# Altium PCB WireCuttingSampling.PcbDoc (part 1 of 2)
Units mil, origin at the board's own origin, x right, y up, seen from the top; angles counter-clockwise.
Board outline 4901 x 3424.05 mil, 2 copper layers (Top Layer, Bottom Layer); 137 components, 97 nets, 362 pads, 199 vias.
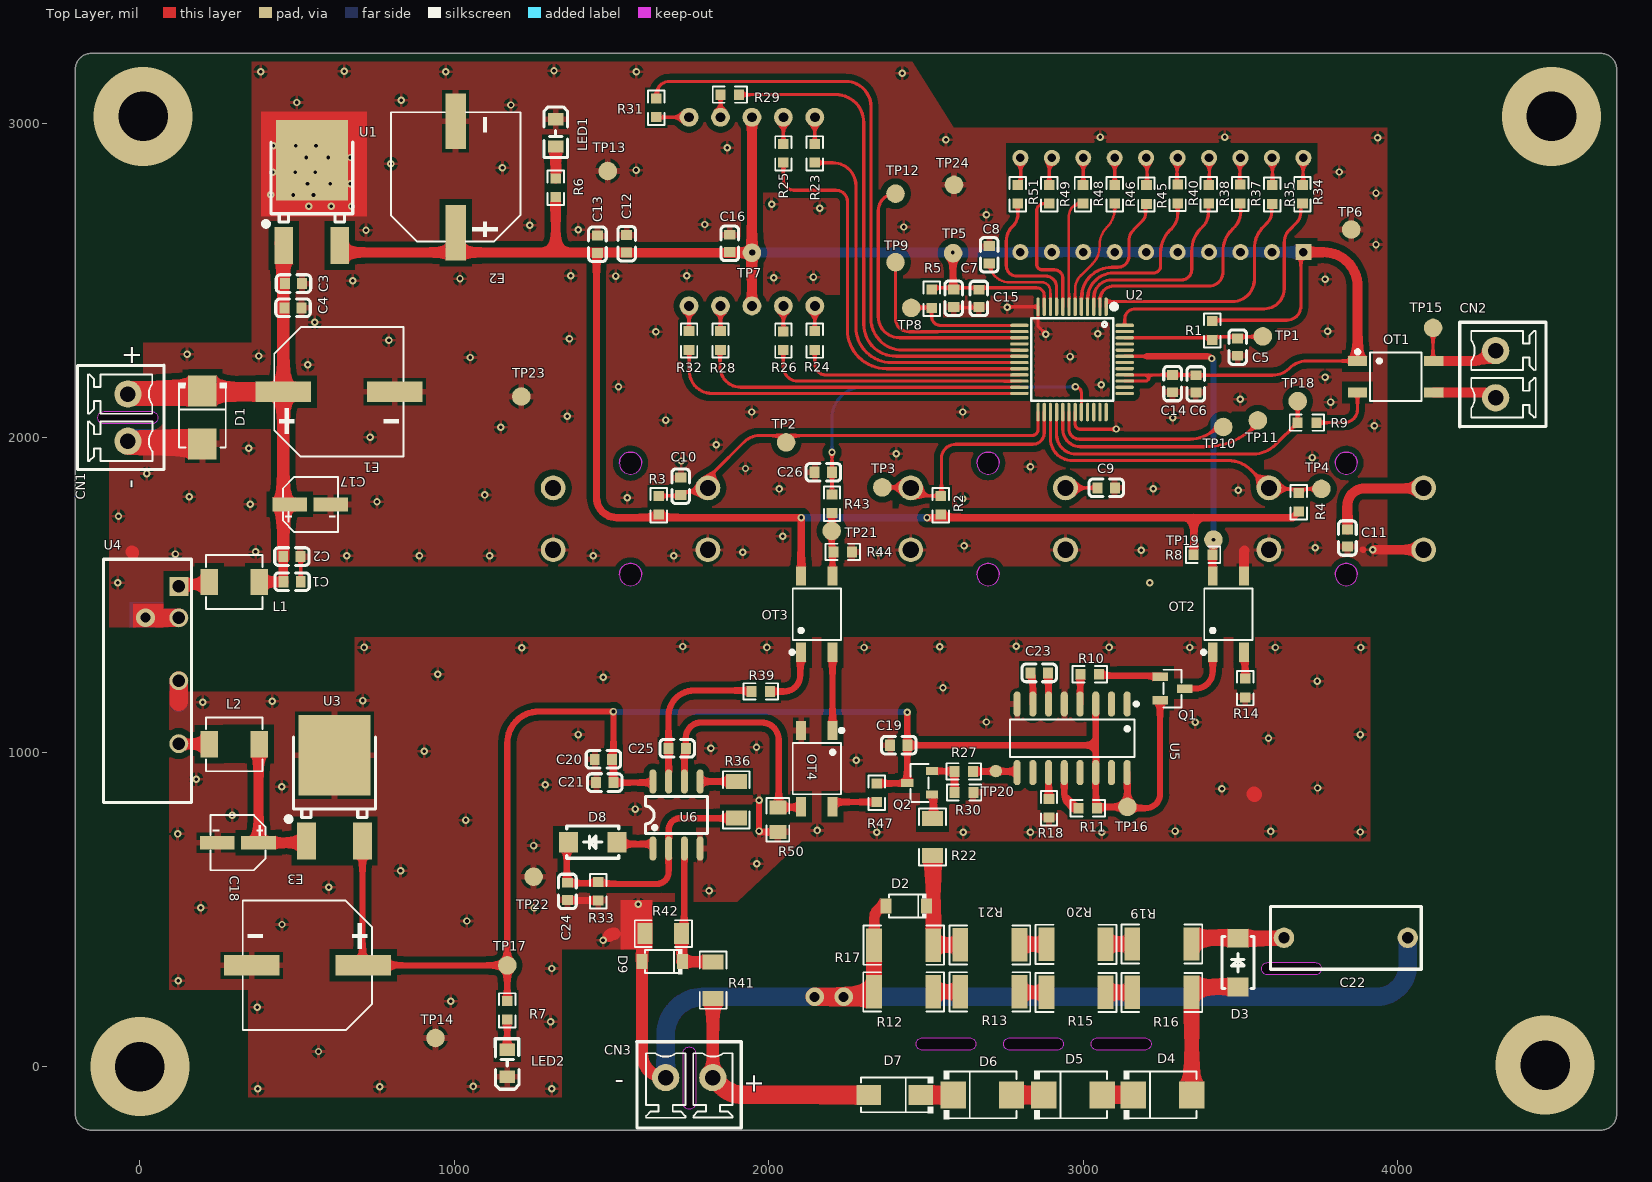
[diagram p0: Top Layer view]
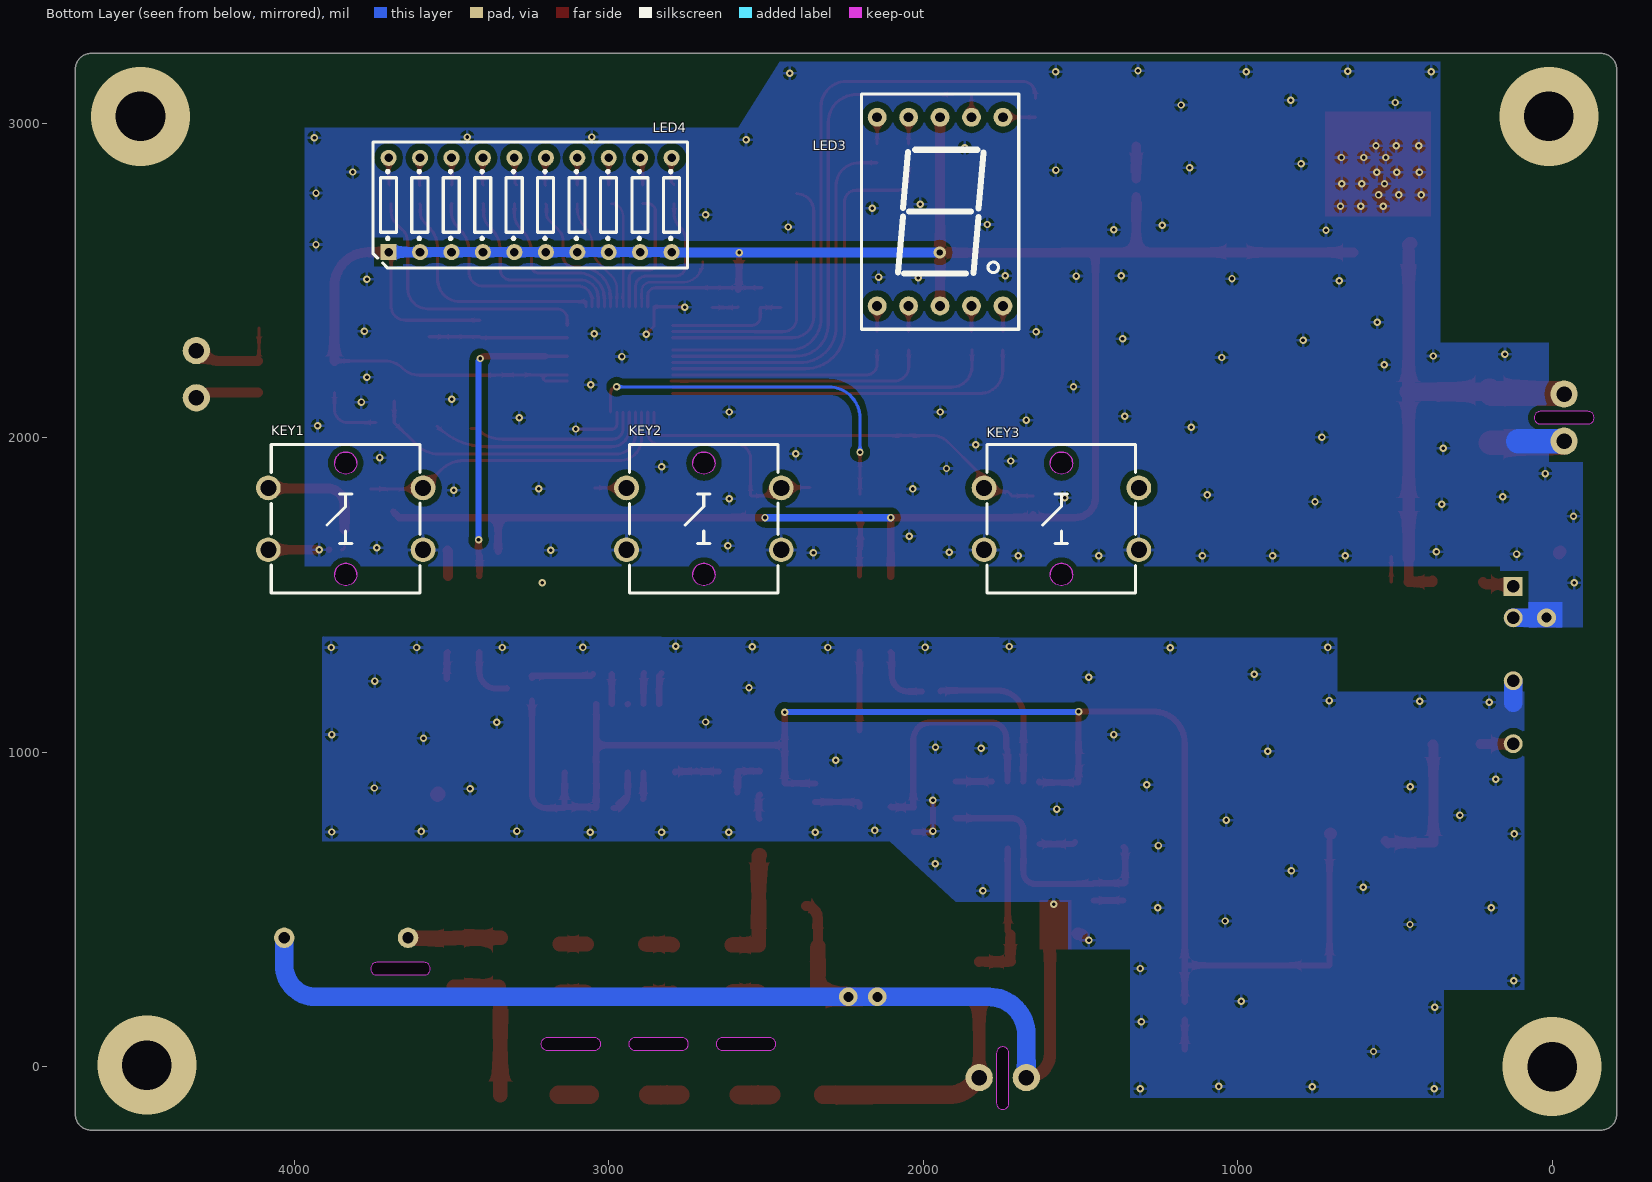
[diagram p1: Bottom Layer view, seen from below]

## Layer stack, top to bottom
Top Solder: solder mask 0.4, Solder Resist, Dk 3.5
Top Layer: signal copper 1.4
Dielectric 1: dielectric 12.6, FR-4, Dk 4.8
Bottom Layer: signal copper 1.4
Bottom Solder: solder mask 0.4, Solder Resist, Dk 3.5

## Board outline
-155,-202 cw(c-155,-152) -205,-152 -204.96,3172.05 -204.9,3172.05 cw(c-154.9,3172.05) -154.9,3222.05 4646,3222.05 cw(c4646,3172.05) 4696,3172.05 4696,-152 cw(c4646,-152) 4646,-202 4645.15,-202
cut-out: -114,2043.97 cw(c-114,2063.65) -114,2083.34 37,2083.34 cw(c37,2063.65) 37,2043.97
cut-out: 1727.64,-116 1727.62,43 cw(c1747.31,43) 1766.99,43 1767,43 1767,-116 1767.01,-116 cw(c1747.32,-116)
cut-out: 3586.68,291.76 cw(c3586.68,311.44) 3586.68,331.13 3737.68,331.13 cw(c3737.68,311.44) 3737.68,291.76
cut-out: 3045,52.26 cw(c3045,71.95) 3045,91.63 3196,91.63 cw(c3196,71.95) 3196,52.26
cut-out: 2766,52.26 cw(c2766,71.95) 2766,91.63 2917,91.63 cw(c2917,71.95) 2917,52.26
cut-out: 2488,52.26 cw(c2488,71.95) 2488,91.63 2639,91.63 cw(c2639,71.95) 2639,52.26

## Design rules (kind name [scope] priority, off if disabled: settings)
Clearance Clearance_1 [InPolygon] p1: gap=19.68 ignorepadtopadclearanceinfootprint=FALSE
Clearance [All] p2: gap=7.87 ignorepadtopadclearanceinfootprint=FALSE
PlaneConnect [All] p1: planeconnectstyle=Relief reliefexpansion=20 reliefentries=4 reliefconductorwidth=19.68 reliefairgap=19.68
PolygonConnect [All] p1: thpad.connectstyle=Relief thpad.reliefconductorwidth=10 thpad.reliefentries=4 thpad.polygonreliefangle="90 Angle" thpad.airgapwidth=10 smdpad.connectstyle=Relief smdpad.reliefconductorwidth=19.68 smdpad.reliefentries=4 smdpad.polygonreliefangle="90 Angle" smdpad.airgapwidth=10 via.connectstyle=Relief via.reliefconductorwidth=10 via.reliefentries=4 via.polygonreliefangle="90 Angle" via.airgapwidth=10
RoutingVias [All] p1: holewidth=28 width=50 viastyle="Through Hole" minholewidth=28 minwidth=50 maxholewidth=28 maxwidth=50
SolderMaskExpansion [All] p1: expansion=4 istentingtop=FALSE
Width 5V [All] p1: maxlimit=78.74 minlimit=7.87 preferedwidth=39.37 minimp=50.000000 maximp=50.000000 favimp=50.000000
Width 12V [InNet('+12V')] p2: maxlimit=78.74 minlimit=7.87 preferedwidth=59.06 minimp=50.000000 maximp=50.000000 favimp=50.000000
Width [All] p3: maxlimit=78.74 minlimit=7.87 preferedwidth=10 minimp=50.000000 maximp=50.000000 favimp=50.000000
29 further rules are at their usual default settings.

## Components (designator, comment, footprint, x,y, rotation, side; value= is the part's Value field where it differs from the comment)
C1 "10nF ±10%" C0603 484,1542 r180 top value=10nF
C2 "100nF ±10%" C0603 483.5,1622 r180 top value=100nF
C3 "10nF ±10%" C0603 488.5,2489.95 r180 top value=10nF
C4 "100nF ±10%" C0603 487,2412.95 r180 top value=100nF
C5 "10uF ±20%" C0603 3491,2288 r90 top value=10uF
C6 "100nF ±10%" C0603 3358,2171 r90 top value=100nF
C7 "100nF ±10%" C0603 2588,2443.5 r270 top value=100nF
C8 "1uF ±10%" C0603 2701,2581.6 r270 top value=1uF
C9 "100nF ±10%" C0603 3073.11,1840.4 r180 top value=100nF
C10 "100nF ±10%" C0603 1720,1845.6 r270 top value=100nF
C11 "100nF ±10%" C0603 3840,1681 r90 top value=100nF
C12 "100nF ±10%" C0603 1548,2617 r270 top value=100nF
C13 "100nF ±10%" C0603 1455,2615 r270 top value=100nF
C14 "10nF ±10%" C0603 3284,2172 r90 top value=10nF
C15 "10nF ±10%" C0603 2668,2443 r90 top value=10nF
C16 "100nF ±10%" C0603 1876,2618 r270 top value=100nF
C17 "vt50v4r7m4x5" CAP-SMD_BD4.0-L4.3-W4.3-LS5.0-FD 542,1787.63 r0 top value=4.7uF
C18 "vt50v4r7m4x5" CAP-SMD_BD4.0-L4.3-W4.3-LS5.0-FD 312,712 r180 top value=4.7uF
C19 "100nF ±10%" C0603 2413.5,1022 r180 top value=100nF
C20 "100nF ±10%" C0603 1474,977 r180 top value=100nF
C21 "10nF ±10%" C0603 1478.5,903.13 r180 top value=10nF
C22 "33nF ±10%" CAP-TH_L12.0-W5.0-P10.00-D0.6-1 3835,409.68 r0 top value=33nF
C23 "470nF ±10%" C0603 2860,1252 r0 top value=470nF
C24 "100nF ±10%" C0603 1359.67,557.23 r270 top value=100nF
C25 "100nF ±10%" C0603 1708.67,1012.13 r180 top value=100nF
C26 "100nF ±10%" C0603 2173.5,1890 r180 top value=100nF
CN1 "wj15edgvc-3.81-02p-14-00a" CONN-TH_WJ15EDGVC-3.81-2P -38,2063.79 r270 top
CN2 "wj15edgvc-3.81-02p-14-00a" CONN-TH_WJ15EDGVC-3.81-2P 4311.37,2202 r90 top
CN3 "wj15edgvc-3.81-02p-14-00a" CONN-TH_WJ15EDGVC-3.81-2P 1747,-35 r0 top
D1 "smbj15a_c19077569" SMB_L4.3-W3.6-LS5.3-RD 199,2064.26 r270 top
D2 "bzt52c5v1" SOD-123_L2.7-W1.6-LS3.7-RD 2437,511 r180 top
D3 "ss14_c2480" SMA_L4.2-W2.6-LS5.0-RD_1 3492,330.68 r270 top
D4 "smbj12a_c353398" SMB_L4.6-W3.6-LS5.3-RD 3252,-90 r0 top
D5 "smbj12a_c353398" SMB_L4.6-W3.6-LS5.3-RD 2967,-90 r0 top
D6 "smbj12a_c353398" SMB_L4.6-W3.6-LS5.3-RD 2679,-90 r0 top
D7 "1n4007" SMA_L4.3-W2.5-LS5.0-RD 2400.7,-90 r180 top
D8 "ss14_c2480" SMA_L4.2-W2.6-LS5.0-RD_1 1440,713.76 r0 top
D9 "bzt52c5v1" SOD-123_L2.7-W1.6-LS3.7-RD 1661,333.76 r180 top
E1 "1000uf 16v" CAP-SMD_BD10.0-L10.3-W10.3-FD 633.1,2145.95 r0 top value=1000uF
E2 "1000uf 16v" CAP-SMD_BD10.0-L10.3-W10.3-FD 1004,2829.1 r90 top value=1000uF
E3 "1000uf 16v" CAP-SMD_BD10.0-L10.3-W10.3-FD 533,322 r180 top value=1000uF
KEY1 "b3f-4055_c84931" KEY-TH_4P-L12.0-W12.0-P5.00-LS13.4-EH 3836.48,1742 r0 bottom locked
KEY2 "b3f-4055_c84931" KEY-TH_4P-L12.0-W12.0-P5.00-LS13.4-EH 2697.37,1742 r0 bottom locked
KEY3 "b3f-4055_c84931" KEY-TH_4P-L12.0-W12.0-P5.00-LS13.4-EH 1560.26,1742 r0 bottom locked
L1 "fxl0420-4r7-m" IND-SMD_L4.4-W4.2 300.2,1541 r0 top value=4.7uH
L2 "fxl0420-4r7-m" IND-SMD_L4.4-W4.2 300.2,1025 r180 top value=4.7uH
LED1 "xl-2012ubc" LED0805-RD 1322.37,2969.3 r270 top
LED2 "xl-2012ubc" LED0805-RD 1168,10.7 r90 top
LED3 "sm410561n" LED-SEG-TH_10P-L12.7-W19.0-P2.54-S15.24-BL 1946.37,2719 r180 bottom
LED4 "b1001sdrwb/s530-a3" LED-SEG-TH_20P-L25.3-W10.1-P2.54-S7.6-BL 3250,2740 r180 bottom
OT1 "ltv-356t-c" SOP-4_L3.9-W4.4-P2.54-LS7.0-TL 3993.57,2194 r0 top
OT2 "ltv-356t-c" SOP-4_L3.9-W4.4-P2.54-LS7.0-TL 3461.67,1438.76 r90 top
OT3 "ltv-356t-c" SOP-4_L3.9-W4.4-P2.54-LS7.0-TL 2153,1438.76 r90 top
OT4 "ltv-356t-c" SOP-4_L3.9-W4.4-P2.54-LS7.0-TL 2153,947.7 r270 top
Q1 "s9015_c20069131" SOT-23-3_L2.9-W1.3-P0.95-LS2.4-BR 3284,1202 r180 top
Q2 "2n7002kt1g" SOT-23-3_L2.9-W1.3-P1.90-LS2.4-BR 2479.67,902.13 r0 top
R1 "frc0603f1002ts" R0603 3410,2340.76 r90 top value=10kΩ
R2 "frc0603f1002ts" R0603 2547,1785.4 r270 top value=10kΩ
R3 "frc0603f1002ts" R0603 1650,1785.4 r270 top value=10kΩ
R4 "frc0603f1002ts" R0603 3685.37,1795 r270 top value=10kΩ
R5 "frc0603f1002ts" R0603 2518,2442.06 r90 top value=10kΩ
R6 "frc0603f1002ts" R0603 1322.37,2795 r270 top value=10kΩ
R7 "frc0603f1002ts" R0603 1168,179 r270 top value=10kΩ
R8 "frc0603f2201ts" R0603 3381,1627.76 r180 top value=2.2kΩ
R9 "510Ω ±1%" R0603 3711.37,2048 r180 top value=510Ω
R10 "5.1kΩ ±1%" R0603 3020.67,1248 r0 top value=5.1kΩ
R11 "1MΩ ±1%" R0603 3013.97,822 r0 top value=1MΩ
R12 "2kΩ ±1%" R2010 2428.9,238 r180 top value=2kΩ
R13 "2kΩ ±1%" R2010 2702.9,238 r180 top value=2kΩ
R14 "510Ω ±1%" R0603 3515,1203.76 r90 top value=510Ω
R15 "2kΩ ±1%" R2010 2976.9,236 r180 top value=2kΩ
R16 "2kΩ ±1%" R2010 3250,236 r180 top value=2kΩ
R17 "12kΩ ±1%" R2010 2429,386 r180 top value=12kΩ
R18 "1kΩ ±1%" R0603 2891,821.76 r90 top value=1kΩ
R19 "2kΩ ±1%" R2010 3250,390 r0 top value=2kΩ
R20 "2kΩ ±1%" R2010 2976.9,389 r0 top value=2kΩ
R21 "2kΩ ±1%" R2010 2702.9,387 r0 top value=2kΩ
R22 "4.7kΩ ±1%" R1206 2520.67,730.2 r90 top value=4.7kΩ
R23 "1kΩ ±1%" R0603 2146.37,2904.1 r270 top value=1kΩ
R24 "1kΩ ±1%" R0603 2146.37,2309 r270 top value=1kΩ
R25 "1kΩ ±1%" R0603 2046.37,2904.1 r270 top value=1kΩ
R26 "1kΩ ±1%" R0603 2046.37,2308.7 r270 top value=1kΩ
R27 "frc0603f2201ts" R0603 2620,938.76 r180 top value=2.2kΩ
R28 "1kΩ ±1%" R0603 1846.37,2309 r90 top value=1kΩ
R29 "1kΩ ±1%" R0603 1876.37,3091 r180 top value=1kΩ
R30 "1.5kΩ ±1%" R0603 2621,871.76 r180 top value=1.5kΩ
R31 "1kΩ ±1%" R0603 1642.37,3049 r270 top value=1kΩ
R32 "1kΩ ±1%" R0603 1746.37,2309 r90 top value=1kΩ
R33 "1MΩ ±1%" R0603 1458,558 r270 top value=1MΩ
R34 "1kΩ ±1%" R0603 3697,2774 r270 top value=1kΩ
R35 "1kΩ ±1%" R0603 3601,2773.4 r270 top value=1kΩ
R36 "4.7kΩ ±1%" R1206 1896.67,848.33 r90 top value=4.7kΩ
R37 "1kΩ ±1%" R0603 3499,2775 r270 top value=1kΩ
R38 "1kΩ ±1%" R0603 3399,2774 r270 top value=1kΩ
R39 "330Ω ±1%" R0603 1974.37,1193 r0 top value=330Ω
R40 "1kΩ ±1%" R0603 3300,2775 r270 top value=1kΩ
R41 "frc1206j104 ts" R1206 1823,275 r90 top value=100kΩ
R42 "frc1206j222 ts" R1206 1664.8,423 r0 top value=2.2kΩ
R43 "47kΩ ±1%" R0603 2201,1790 r90 top value=47kΩ
R44 "frc0603f2201ts" R0603 2235,1636.76 r0 top value=2.2kΩ
R45 "1kΩ ±1%" R0603 3201,2773.4 r270 top value=1kΩ
R46 "1kΩ ±1%" R0603 3100,2774 r270 top value=1kΩ
R47 "frc0603f2201ts" R0603 2343.37,871 r90 top value=2.2kΩ
R48 "1kΩ ±1%" R0603 2999,2774 r270 top value=1kΩ
R49 "1kΩ ±1%" R0603 2891.96,2774 r270 top value=1kΩ
R50 "frc0805f4601ts" R0805 2029,785.3 r90 top value=4.6kΩ
R51 "1kΩ ±1%" R0603 2791.96,2774.4 r270 top value=1kΩ
TP1 "TP" TP#1 3571,2322 r0 top
TP2 "TP" TP#1 2055,1985 r90 top
TP3 "TP" TP#1 2361,1842 r90 top
TP4 "TP" TP#1 3757.37,1837 r0 top
TP5 "TP" TP#1 2586,2586.76 r90 top
TP6 "TP" TP#1 3852,2662 r90 top
TP7 "TP" TP#1 1946.27,2588 r0 top
TP8 "TP" TP#1 2453,2412.76 r90 top
TP9 "TP" TP#1 2403,2558 r90 top
TP10 "TP" TP#1 3445,2034 r90 top
TP11 "TP" TP#1 3555,2055 r90 top
TP12 "TP" TP#1 2403,2776 r90 top
TP13 "TP" TP#1 1488,2848 r90 top
TP14 "TP" TP#1 940,91 r90 top
TP15 "TP" TP#1 4112.37,2349 r90 top
TP16 "TP" TP#1 3140.37,826 r90 top
TP17 "TP" TP#1 1168.37,322 r90 top
TP18 "TP" TP#1 3682,2116 r90 top
TP19 "TP" TP#1 3414,1675.76 r270 top
TP20 "TP" TP#2 2722,939.76 r0 top
TP21 "TP" TP#1 2200,1703.4 r90 top
TP22 "TP" TP#1 1252,603.76 r90 top
TP23 "TP" TP#1 1213,2131 r90 top
TP24 "TP" TP#1 2589,2804 r90 top
U1 "cj78m05" TO-252-3_L6.5-W5.8-P4.58-TL 547,2746.94 r90 top
U2 "m0518ld2ae" LQFP-48_L7.0-W7.0-P0.50-LS9.0-BL 2964.48,2249 r180 top
U3 "cj78m05" TO-252-3_L6.5-W5.8-P4.58-TL 619,854 r90 top
U4 "b1212s-2wr3_c2992389" PWRM-TH_4P-L19.7-W7.1-P2.54_DEXU_NN2-12S05CN 124,1277 r270 top value=100kHz
U5 "cd4046bm/tr" SOP-16_L9.9-W3.9-P1.27-LS6.0-BL 2964.67,1044.1 r180 top
U6 "lm358dr2g" SOIC-8_L5.0-W4.0-P1.27-LS6.0-BL 1706.67,800.13 r0 top

## Footprints (in the part's own frame and the unit in brackets; to place one, negate y for a bottom-side part, rotate by r counter-clockwise, add the part's x,y. Pads: shape width x height; smd on the part's side, far side on the other; paste and mask are expansions set on the pad)
C0603 [mil]
  rect 31.5x35.4 smd: 1(-27.5,0) 2(27.6,0)
  silkscreen extent -55,-28 55,28
CAP-SMD_BD4.0-L4.3-W4.3-LS5.0-FD [mil]
  rect 110.2x43.3 smd: 1(-65.4,0) 2(65.4,0)
  silkscreen extent -87,-88 88,88
CAP-SMD_BD10.0-L10.3-W10.3-FD [mil]
  rect 177.2x65 smd: 1(-177.1,0) 2(177.2,0)
  silkscreen extent -206,-206 206,206
CAP-TH_L12.0-W5.0-P10.00-D0.6-1 [mil]
  round 65 hole 35.4: 1(-196.8,0) 2(196.8,0)
  silkscreen extent -240,-100 240,100
CONN-TH_WJ15EDGVC-3.81-2P [mil]
  round 86.6 hole 49.2: 1(-75,0) 2(75,0)
  silkscreen extent -168,-160 165,114
IND-SMD_L4.4-W4.2 [mil]
  rect 55.1x83.5 smd: 1(79.8,0) 2(-79.8,0)
  silkscreen extent -90,-86 90,86
KEY-TH_4P-L12.0-W12.0-P5.00-LS13.4-EH [mil]
  round 78.7 hole 51.2: 1(246.1,-98.4) 2(-246,-98.4) 3(246.1,98.4) 4(-246,98.4)
  Keep-Out Layer board cut-out: 35.5,-177.2 35.1,-182.5 33.9,-187.6 32,-192.6 29.3,-197.1 26,-201.3 22.1,-204.9 17.7,-207.9 13,-210.2 7.9,-211.7 2.7,-212.5 -2.6,-212.5 -7.9,-211.7 -12.9,-210.2 -17.7,-207.9 -22.1,-204.9 -25.9,-201.3 -29.2,-197.1 -31.9,-192.6 -33.8,-187.6 -35,-182.5 -35.4,-177.2 -35,-171.9 -33.8,-166.7 -31.9,-161.8 -29.2,-157.2 -25.9,-153.1 -22.1,-149.5 -17.7,-146.5 -12.9,-144.2 -7.9,-142.6 -2.6,-141.9 2.7,-141.9 7.9,-142.6 13,-144.2 17.7,-146.5 22.1,-149.5 26,-153.1 29.3,-157.2 32,-161.8 33.9,-166.7 35.1,-171.9 35.5,-177.2
  Keep-Out Layer board cut-out: 35.5,177.1 35.1,171.9 33.9,166.7 32,161.8 29.3,157.2 26,153 22.1,149.4 17.7,146.5 13,144.2 7.9,142.6 2.7,141.8 -2.6,141.8 -7.9,142.6 -12.9,144.2 -17.7,146.5 -22.1,149.4 -25.9,153 -29.2,157.2 -31.9,161.8 -33.8,166.7 -35,171.9 -35.4,177.1 -35,182.4 -33.8,187.6 -31.9,192.5 -29.2,197.1 -25.9,201.2 -22.1,204.8 -17.7,207.8 -12.9,210.1 -7.9,211.7 -2.6,212.5 2.7,212.5 7.9,211.7 13,210.1 17.7,207.8 22.1,204.8 26,201.2 29.3,197.1 32,192.5 33.9,187.6 35.1,182.4 35.5,177.1
  Keep-Out Layer region: 35.5,-177.2 35.1,-182.5 33.9,-187.6 32,-192.6 29.3,-197.1 26,-201.3 22.1,-204.9 17.7,-207.9 13,-210.2 7.9,-211.7 2.7,-212.5 -2.6,-212.5 -7.9,-211.7 -12.9,-210.2 -17.7,-207.9 -22.1,-204.9 -25.9,-201.3 -29.2,-197.1 -31.9,-192.6 -33.8,-187.6 -35,-182.5 -35.4,-177.2 -35,-171.9 -33.8,-166.7 -31.9,-161.8 -29.2,-157.2 -25.9,-153.1 -22.1,-149.5 -17.7,-146.5 -12.9,-144.2 -7.9,-142.6 -2.6,-141.9 2.7,-141.9 7.9,-142.6 13,-144.2 17.7,-146.5 22.1,-149.5 26,-153.1 29.3,-157.2 32,-161.8 33.9,-166.7 35.1,-171.9 35.5,-177.2
  Keep-Out Layer region: 35.5,-177.2 35.1,-182.5 33.9,-187.6 32,-192.6 29.3,-197.1 26,-201.3 22.1,-204.9 17.7,-207.9 13,-210.2 7.9,-211.7 2.7,-212.5 -2.6,-212.5 -7.9,-211.7 -12.9,-210.2 -17.7,-207.9 -22.1,-204.9 -25.9,-201.3 -29.2,-197.1 -31.9,-192.6 -33.8,-187.6 -35,-182.5 -35.4,-177.2 -35,-171.9 -33.8,-166.7 -31.9,-161.8 -29.2,-157.2 -25.9,-153.1 -22.1,-149.5 -17.7,-146.5 -12.9,-144.2 -7.9,-142.6 -2.6,-141.9 2.7,-141.9 7.9,-142.6 13,-144.2 17.7,-146.5 22.1,-149.5 26,-153.1 29.3,-157.2 32,-161.8 33.9,-166.7 35.1,-171.9 35.5,-177.2
  Keep-Out Layer region: 35.5,177.1 35.1,171.9 33.9,166.7 32,161.8 29.3,157.2 26,153 22.1,149.4 17.7,146.5 13,144.2 7.9,142.6 2.7,141.8 -2.6,141.8 -7.9,142.6 -12.9,144.2 -17.7,146.5 -22.1,149.4 -25.9,153 -29.2,157.2 -31.9,161.8 -33.8,166.7 -35,171.9 -35.4,177.1 -35,182.4 -33.8,187.6 -31.9,192.5 -29.2,197.1 -25.9,201.2 -22.1,204.8 -17.7,207.8 -12.9,210.1 -7.9,211.7 -2.6,212.5 2.7,212.5 7.9,211.7 13,210.1 17.7,207.8 22.1,204.8 26,201.2 29.3,197.1 32,192.5 33.9,187.6 35.1,182.4 35.5,177.1
  Keep-Out Layer region: 35.5,177.1 35.1,171.9 33.9,166.7 32,161.8 29.3,157.2 26,153 22.1,149.4 17.7,146.5 13,144.2 7.9,142.6 2.7,141.8 -2.6,141.8 -7.9,142.6 -12.9,144.2 -17.7,146.5 -22.1,149.4 -25.9,153 -29.2,157.2 -31.9,161.8 -33.8,166.7 -35,171.9 -35.4,177.1 -35,182.4 -33.8,187.6 -31.9,192.5 -29.2,197.1 -25.9,201.2 -22.1,204.8 -17.7,207.8 -12.9,210.1 -7.9,211.7 -2.6,212.5 2.7,212.5 7.9,211.7 13,210.1 17.7,207.8 22.1,204.8 26,201.2 29.3,197.1 32,192.5 33.9,187.6 35.1,182.4 35.5,177.1
  Keep-Out Layer lines w0.1: -35.4,177.1 -35,182.4 -33.8,187.6 -31.9,192.5 -29.2,197.1 -25.9,201.2 -22.1,204.8 -17.7,207.8 -12.9,210.1 -7.9,211.7 -2.6,212.5 2.7,212.5 7.9,211.7 13,210.1 17.7,207.8 22.1,204.8 26,201.2 29.3,197.1 32,192.5 33.9,187.6 35.1,182.4 35.5,177.1 35.1,171.9 33.9,166.7 32,161.8 29.3,157.2 26,153 22.1,149.4 17.7,146.5 13,144.2 7.9,142.6 2.7,141.8 -2.6,141.8 -7.9,142.6 -12.9,144.2 -17.7,146.5 -22.1,149.4 -25.9,153 -29.2,157.2 -31.9,161.8 -33.8,166.7 -35,171.9 -35.4,177.1 ; -35.4,-177.2 -35,-171.9 -33.8,-166.7 -31.9,-161.8 -29.2,-157.2 -25.9,-153.1 -22.1,-149.5 -17.7,-146.5 -12.9,-144.2 -7.9,-142.6 -2.6,-141.9 2.7,-141.9 7.9,-142.6 13,-144.2 17.7,-146.5 22.1,-149.5 26,-153.1 29.3,-157.2 32,-161.8 33.9,-166.7 35.1,-171.9 35.5,-177.2 35.1,-182.5 33.9,-187.6 32,-192.6 29.3,-197.1 26,-201.3 22.1,-204.9 17.7,-207.9 13,-210.2 7.9,-211.7 2.7,-212.5 -2.6,-212.5 -7.9,-211.7 -12.9,-210.2 -17.7,-207.9 -22.1,-204.9 -25.9,-201.3 -29.2,-197.1 -31.9,-192.6 -33.8,-187.6 -35,-182.5 -35.4,-177.2
  silkscreen extent -236,-236 237,236
LED0805-RD [mil]
  rect 39.4x49.2 smd: 1(-43.3,0) 2(43.3,0)
  silkscreen extent -83,-37 78,38
LED-SEG-TH_10P-L12.7-W19.0-P2.54-S15.24-BL [mil]
  round 60 hole 31.5: 1(-200,-300) 2(-100,-300) 3(0,-300) 4(100,-300) 5(200,-300) 6(200,300) 7(100,300) 8(0,300) 9(-100,300) 10(-200,300)
  silkscreen extent -250,-374 250,374
LED-SEG-TH_20P-L25.3-W10.1-P2.54-S7.6-BL [mil]
  rect 51.2x51.2 hole 27.6 paste+0 mask+2: 1(-450,-150)
  round 51.2 hole 27.6 paste+0 mask+2: 2(-350,-150) 3(-250,-150) 4(-150,-150) 5(-50,-150) 6(50,-150) 7(150,-150) 8(250,-150) 9(350,-150) 10(450,-150) 11(450,150) 12(350,150) 13(250,150) 14(150,150) 15(50,150) 16(-50,150) 17(-150,150) 18(-250,150) 19(-350,150) 20(-450,150)
  silkscreen extent -500,-201 500,201
LQFP-48_L7.0-W7.0-P0.50-LS9.0-BL [mil]
  oval 10.6x59.1 smd paste+0 mask+2: 1(-108.2,-167.3) 2(-88.5,-167.3) 3(-68.9,-167.3) 4(-49.2,-167.3) 5(-29.5,-167.3) 6(-9.8,-167.3) 7(9.9,-167.3) 8(29.6,-167.3) 9(49.3,-167.3) 10(68.9,-167.3) 11(88.6,-167.3) 12(108.3,-167.3) 25(108.3,167.4) 26(88.6,167.4) 27(68.9,167.4) 28(49.3,167.4) 29(29.6,167.4) 30(9.9,167.4) 31(-9.8,167.4) 32(-29.5,167.4) 33(-49.2,167.4) 34(-68.9,167.4) 35(-88.5,167.4) 36(-108.2,167.4)
  oval 59.1x10.6 smd paste+0 mask+2: 13(167.4,-108.2) 14(167.4,-88.5) 15(167.4,-68.9) 16(167.4,-49.2) 17(167.4,-29.5) 18(167.4,-9.8) 19(167.4,9.9) 20(167.4,29.6) 21(167.4,49.3) 22(167.4,68.9) 23(167.4,88.6) 24(167.4,108.3) 37(-167.3,108.3) 38(-167.3,88.6) 39(-167.3,68.9) 40(-167.3,49.3) 41(-167.3,29.6) 42(-167.3,9.9) 43(-167.3,-9.8) 44(-167.3,-29.5) 45(-167.3,-49.2) 46(-167.3,-68.9) 47(-167.3,-88.5) 48(-167.3,-108.2)
  silkscreen extent -141,-176 130,132
PWRM-TH_4P-L19.7-W7.1-P2.54_DEXU_NN2-12S05CN [mil]
  rect 60x60 hole 39.4: 1(-250,0)
  round 60 hole 39.4: 2(-150,0) 4(50,0) 6(250,0)
  silkscreen extent -337,-240 437,40
R0603 [mil]
  rect 31.8x34 smd paste-3937 mask+2: 1(-29.6,0) 2(29.7,0)
  silkscreen extent -54,-26 55,26
R0805 [mil]
  rect 44.6x54.2 smd paste-3937 mask+2: 1(-39.3,0) 2(39.4,0)
  silkscreen extent -69,-36 69,36
R1206 [mil]
  rect 47.5x67 smd paste-3937 mask+2: 1(-58.2,0) 2(58.2,0)
  silkscreen extent -91,-43 91,43
R2010 [mil]
  rect 50.5x106.3 smd paste-3937 mask+2: 1(-94.1,0) 2(94.1,0)
  silkscreen extent -128,-62 128,62
SMA_L4.2-W2.6-LS5.0-RD_1 [mil]
  rect 59.8x66.1 smd: 1(-77.4,0) 2(77.3,0)
  silkscreen extent -83,-51 83,51
SMA_L4.3-W2.5-LS5.0-RD [mil]
  rect 78.7x62.7 smd: 1(-82.6,0) 2(82.7,0)
  silkscreen extent -122,-58 107,58
SMB_L4.3-W3.6-LS5.3-RD [mil]
  rect 98.4x90.6 smd: 1(-84.7,0) 2(84.6,0)
  silkscreen extent -111,-77 96,77
SMB_L4.6-W3.6-LS5.3-RD [mil]
  rect 80.6x86.3 smd: 1(-92.9,0) 2(93,0)
  silkscreen extent -123,-77 108,77
SOD-123_L2.7-W1.6-LS3.7-RD [mil]
  rect 35.8x48 smd: 1(-64.4,0) 2(64.4,0)
  silkscreen extent -63,-40 54,39
SOIC-8_L5.0-W4.0-P1.27-LS6.0-BL [mil]
  oval 22.4x76.8 smd: 1(-75,-106.5) 2(-25,-106.5) 3(25,-106.5) 4(75,-106.5) 5(75,106.5) 6(25,106.5) 7(-25,106.5) 8(-75,106.5)
  silkscreen extent -98,-59 98,59
SOP-4_L3.9-W4.4-P2.54-LS7.0-TL [mil]
  rect 61.4x31.5 smd: 1(-121.2,50) 2(-121.2,-50) 3(121.3,-50) 4(121.3,50)
  silkscreen extent -127,-77 82,85
SOP-16_L9.9-W3.9-P1.27-LS6.0-BL [mil]
  oval 22.6x80.2 smd: 1(-175,-109) 2(-125,-109) 3(-75,-109) 4(-25,-109) 5(25,-109) 6(75,-109) 7(125,-109) 8(175,-109) 9(175,109.1) 10(125,109.1) 11(75,109.1) 12(25,109.1) 13(-25,109.1) 14(-75,109.1) 15(-125,109.1) 16(-175,109.1)
  silkscreen extent -210,-115 198,60
SOT-23-3_L2.9-W1.3-P0.95-LS2.4-BR [mil]
  rect 49.2x27.6 smd: 1(39.3,-37.4) 2(39.3,37.4) 3(-39.4,0)
  silkscreen extent -29,-60 29,60
SOT-23-3_L2.9-W1.3-P1.90-LS2.4-BR [mil]
  rect 39.4x25.6 smd: 1(39.3,-37.4) 2(39.3,37.4) 3(-39.4,0)
  silkscreen extent -29,-60 28,60
TO-252-3_L6.5-W5.8-P4.58-TL [mil]
  rect 118.1x59.1 smd: 1(-136.1,89) 3(-136.1,-88.9)
  rect 255.9x228.3 smd: 2(136,0)
  silkscreen extent -75,-130 194,154
TP#1 [mm]
  round 1.5 smd: 1(0,0)
TP#2 [mm]
  round 1 smd: 1(0,0)

## Part data
C1 C3 C14 C15 C21: library part cc0603krx7r9bb103, "容值:10nF;精度:±10%;额定电压:50V;温度系数:X7R;", JLCPCB Part Class="Extended Part", LCSC Part Name="10nF ±10% 50V", Manufacturer=YAGEO(国巨), ManufacturerPart=CC0603KRX7R9BB103, Temperature Coefficient=X7R, Tolerance=±10%, Voltage Rating=50V, AddInBom=yes, ConvertToPcb=yes, Datasheet=https://item.szlcsc.com/datasheet/CC0603KRX7R9BB103/101256.html, FootprintName=C0603, ModelId=ac125912035d415993ca9572d50418b1, ModelName=C0603_L1.6-W0.8-H0.8, ModelTransform=62.992,31.496,0,0,0,0,0,0,0, Supplier=LCSC, Supplier Footprint=0603, SupplierPart=C100042, Symbol=CC0603KRX7R9BB103
C2 C4 C6 C7 C9 C10 C11 C12 C13 C16 C19 C20 C24 C25 C26: library part cl10b104kb8nnnc, "容值:100nF;精度:±10%;额定电压:50V;温度系数:X7R;", JLCPCB Part Class="Extended Part", LCSC Part Name="100nF ±10% 50V", Manufacturer=SAMSUNG(三星), ManufacturerPart=CL10B104KB8NNNC, Temperature Coefficient=X7R, Tolerance=±10%, Voltage Rating=50V, AddInBom=yes, ConvertToPcb=yes, Datasheet=https://item.szlcsc.com/datasheet/CL10B104KB8NNNC/1943.html, FootprintName=C0603, ModelId=ac125912035d415993ca9572d50418b1, ModelName=C0603_L1.6-W0.8-H0.8, ModelTransform=62.992,31.496,0,0,0,0,0,0,0, Supplier=LCSC, Supplier Footprint=0603, SupplierPart=C1591, Symbol=CL10B104KB8NNNC
C5: library part hgc0603r5106m160nthj, "容值:10uF;精度:±20%;额定电压:16V;温度系数:X5R;", JLCPCB Part Class="Extended Part", LCSC Part Name="10uF ±20% 16V", Manufacturer=Chinocera(华瓷), ManufacturerPart=HGC0603R5106M160NTHJ, Temperature Coefficient=X5R, Tolerance=±20%, Voltage Rating=16V, AddInBom=yes, ConvertToPcb=yes, Datasheet=https://item.szlcsc.com/datasheet/HGC0603R5106M160NTHJ/8532806.html, FootprintName=C0603, ModelId=ac125912035d415993ca9572d50418b1, ModelName=C0603_L1.6-W0.8-H0.8, ModelTransform=62.992,31.496,0,0,0,0,0,0,0, Supplier=LCSC, Supplier Footprint=0603, SupplierPart=C7472959, Symbol=HGC0603R5106M160NTHJ
C8: library part cl10a105ko8nnnc, "容值:1uF;精度:±10%;额定电压:16V;温度系数:X5R;", JLCPCB Part Class="Extended Part", LCSC Part Name="1uF ±10% 16V", Manufacturer=SAMSUNG(三星), ManufacturerPart=CL10A105KO8NNNC, Temperature Coefficient=X5R, Tolerance=±10%, Voltage Rating=16V, AddInBom=yes, ConvertToPcb=yes, Datasheet=https://item.szlcsc.com/datasheet/CL10A105KO8NNNC/1944.html, FootprintName=C0603, ModelId=ac125912035d415993ca9572d50418b1, ModelName=C0603_L1.6-W0.8-H0.8, ModelTransform=62.992,31.496,0,0,0,0,0,0,0, Supplier=LCSC, Supplier Footprint=0603, SupplierPart=C1592, Symbol=CL10A105KO8NNNC
C17 C18: "容值:4.7uF;精度:±20%;额定电压:50V;纹波电流:13mA@120Hz;", JLCPCB Part Class="Extended Part", LCSC Part Name="4.7uF ±20% 50V", Manufacturer=JIERR(捷而瑞), ManufacturerPart=VT50V4R7M4X5, Operating Temperature=-40℃~+105℃, Ripple Current=13mA@120Hz, Tolerance=±20%, Voltage Rating=50V, AddInBom=yes, ConvertToPcb=yes, Datasheet=https://item.szlcsc.com/datasheet/VT50V4R7M4X5/51296190.html, Diameter=4mm, FootprintName=CAP-SMD_BD4.0-L4.3-W4.3-LS5.0-FD, Height - Seated (Max)=5.4mm, Lifetime=2000hrs@105℃, ModelId=d5abac2407cc4bb7a22453350802a0e2, ModelName=CAP-SMD_L4.3-W4.3-H5.3-LS5.1, ModelTransform=169.291,181.102,0,90,0,0,0.376,-0.001,0, Supplier=LCSC, Supplier Footprint=SMD,D4xL5.4mm, SupplierPart=C48970985, Symbol=VT50V4R7M4X5
C22: library part mpx333k31c2kn15600, "容值:33nF;精度:±10%;工作电压(AC):275V；310V；305V;防护等级:X2;", JLCPCB Part Class="Extended Part", LCSC Part Name="33nF ±10% 275V 305V 310V 等级:X2", Manufacturer=KNSCHA(科尼盛), ManufacturerPart=MPX333K31C2KN15600, Operating Temperature=-40℃~+110℃, Ratings=X2, Tolerance=±10%, Voltage(AC)=275V；310V；305V, AddInBom=yes, ConvertToPcb=yes, Datasheet=https://item.szlcsc.com/datasheet/MPX333K31C2KN15600/498791.html, FootprintName=CAP-TH_L12.0-W5.0-P10.00-D0.6-1, ModelId=a949099525614742aa1b794542c34fa9, ModelName=CAP-TH_L12.0-W5.0-P10.00-D0.6-1, ModelTransform=472.44,196.85,0,0,0,0,0,0,-137.795, safety certification=UL；CUL；KC；ENEC；VDE；CQC, Supplier=LCSC, Supplier Footprint=插件,P=10mm, SupplierPart=C489092, Symbol=MPX333K31C2KN15600
C23: library part cc0603krx7r9bb474, "容值:470nF;精度:±10%;额定电压:50V;温度系数:X7R;", JLCPCB Part Class="Extended Part", LCSC Part Name="470nF ±10% 50V", Manufacturer=YAGEO(国巨), ManufacturerPart=CC0603KRX7R9BB474, Temperature Coefficient=X7R, Tolerance=±10%, Voltage Rating=50V, AddInBom=yes, ConvertToPcb=yes, Datasheet=https://item.szlcsc.com/datasheet/CC0603KRX7R9BB474/528404.html, FootprintName=C0603, ModelId=ac125912035d415993ca9572d50418b1, ModelName=C0603_L1.6-W0.8-H0.8, ModelTransform=62.992,31.496,0,0,0,0,0,0,0, Supplier=LCSC, Supplier Footprint=0603, SupplierPart=C513577, Symbol=CC0603KRX7R9BB474
CN1 CN2 CN3: "连接器类型:板端/插座-闭口;固定方式:-;结构:1x2P;间距:3.81mm;颜色:绿色;安装方式:直插;排数:1;每排PIN数:2;额定电流:8A;额定电压:300V;线规 - AWG:-;线规 - 平方毫米:-;工作温度:-40℃~+105℃;", Color=绿色, Current Rating=8A, JLCPCB Part Class="Extended Part", LCSC Part Name="1x2P 3.81mm 排数:1 每排P数:2", Manufacturer=KANGNEX(康奈克斯电气), ManufacturerPart=WJ15EDGVC-3.81-02P-14-00A, Operating Temperature=-40℃~+105℃, Voltage Rating (Max)=300V, AddInBom=yes, Connection Type=-, Connector Type=板端/插座-闭口, ConvertToPcb=yes, Datasheet=https://item.szlcsc.com/datasheet/WJ15EDGVC-3.81-02P-14-00A/8890.html, FootprintName=CONN-TH_WJ15EDGVC-3.81-2P, ModelId=4fb8508385d5450abf2abd114199f87c, ModelName=CONN-TH_DB3.81-LI-2P, ModelTransform=334.645,275.629,0,180,0,0,0,-27.559,-145.669, Mounting Type=直插, Number of Pins=2P, Number of PINs Per Row=2, Number of Positions or Pins=1x2P, Number of Rows=1, Outlet Direction (Vertical Basis)=-, Pitch=3.81mm, Supplier=LCSC, Supplier Footprint=插件,P=3.81mm, SupplierPart=C8396, Symbol=WJ15EDGVC-3.81-2P, Termination Style=-, Wire Gauge - AWG=-, Wire Gauge - mm2=-
D1: "极性:单向;反向截止电压(Vrwm):15V;钳位电压:24.4V;峰值脉冲电流(Ipp):24.59A@10/1000us;峰值脉冲功率(Ppp):600W@10/1000us;击穿电压:18.5V;", Clamping Voltage=24.4V, JLCPCB Part Class="Extended Part", LCSC Part Name="单向TVS 15V截止 峰值浪涌电流：24.59A@10/1000us", Manufacturer=R+O(宏嘉诚), ManufacturerPart=SMBJ15A, Operating Temperature=-55℃~+150℃, Peak Pulse Current (Ipp)=24.59A@10/1000us, Peak Pulse Power Dissipation (Ppp)=600W@10/1000us, Reverse Leakage Current (Ir)=5uA, Reverse Stand-Off Voltage (Vrwm)=15V, Voltage - Breakdown=18.5V, AddInBom=yes, ConvertToPcb=yes, Datasheet=https://item.szlcsc.com/datasheet/SMBJ15A/20275654.html, FootprintName=SMB_L4.3-W3.6-LS5.3-RD, level of protection="IEC 61000-4-2", ModelId=c889f7f4bb1d4007adeb7906fc7ccf08, ModelName=SMB_L4.32-W3.62-LS5.3-RD, ModelTransform=208.661,142.5194,0,0,0,0,0,0,0, Polarity=单向, Supplier=LCSC, Supplier Footprint=DO-214AA(SMB), SupplierPart=C19077569, Symbol=SMBJ15A_C19077569, Type=TVS
D2 D9: library part bzt52c5v1_c19077401, "二极管配置:1个独立式;稳压值(标称值):5.1V;稳压值(范围):4.85V~5.36V;耗散功率(Pd):350mW;", JLCPCB Part Class="Extended Part", LCSC Part Name=表面贴装齐纳二极管, Manufacturer=R+O(宏嘉诚), ManufacturerPart=BZT52C5V1, Operating Junction Temperature Range=-55℃~+150℃, Pd - Power Dissipation=350mW, Reverse Leakage Current (Ir)=2uA, Tolerance=-, Zener Voltage(Nom)=5.1V, Zener Voltage(Range)=4.85V~5.36V, AddInBom=yes, ConvertToPcb=yes, Datasheet=https://item.szlcsc.com/datasheet/BZT52C5V1/20275486.html, Diode Configuration=1个独立式, FootprintName=SOD-123_L2.7-W1.6-LS3.7-RD, Impedance(Zzk)=480Ω, Impedance(Zzt)=60Ω, ModelId=ad7e39f9e5534b3c96ffdc5532ebb493, ModelName=SOD-123_L2.7-W1.6-H1.4-LS3.7, ModelTransform=146.026,62.992,0,180,0,0,0.0005,0,0, Supplier=LCSC, Supplier Footprint=SOD-123, SupplierPart=C19077401, Symbol=BZT52C5V1_C19077401
D3 D8: "二极管配置:独立式;正向压降(Vf):550mV@1A;直流反向耐压(Vr):40V;整流电流:1A;", Current - Rectified=1A, JLCPCB Part Class="Basic Part", LCSC Part Name="电压:40V 电流:1A", Manufacturer=MDD(辰达半导体), ManufacturerPart=SS14, Non-Repetitive Peak Forward Surge Current=25A, Operating Junction Temperature Range=-55℃~+150℃, Reverse Leakage Current (Ir)=300uA@40V, Voltage - DC Reverse(Vr)=40V, Voltage - Forward(Vf@If)=550mV@1A, AddInBom=yes, ConvertToPcb=yes, Datasheet=https://item.szlcsc.com/datasheet/SS14/2857.html, Diode Configuration=独立式, FootprintName=SMA_L4.2-W2.6-LS5.0-RD_1, ModelId=2ad98c37c5614ad18681cbd22e4725e1, ModelName=SMA_L4.2-W2.6-LS5.0-RD_1, ModelTransform=196.85,101.181,0,0,0,0,0,0,0, Supplier=LCSC, Supplier Footprint=SMA(DO-214AC), SupplierPart=C2480, Symbol=SS14
D4 D5 D6: "反向截止电压(Vrwm):12V;钳位电压:19.9V;峰值脉冲电流(Ipp):30.2A;峰值脉冲功率(Ppp):600W@10/1000us;击穿电压:14.7V;", Clamping Voltage=19.9V, JLCPCB Part Class="Extended Part", Junction Capacitance=390pF, LCSC Part Name="TVS 12V截止 峰值浪涌电流：30.2A", Manufacturer=晶导微电子, ManufacturerPart=SMBJ12A, Operating Temperature=-65℃~+150℃, Peak Pulse Current (Ipp)=30.2A, Peak Pulse Power Dissipation (Ppp)=600W@10/1000us, Reverse Leakage Current (Ir)=1uA, Reverse Stand-Off Voltage (Vrwm)=12V, Voltage - Breakdown=14.7V, AddInBom=yes, ConvertToPcb=yes, Datasheet=https://item.szlcsc.com/datasheet/SMBJ12A/329147.html, FootprintName=SMB_L4.6-W3.6-LS5.3-RD, ModelId=5e8926c661484ff2a35b83e5ae62aeb9, ModelName=SMB_L4.6-W3.6-LS5.3-RD, ModelTransform=212.598,141.732,0,0,0,0,0,0,0, Supplier=LCSC, Supplier Footprint=SMB, SupplierPart=C353398, Symbol=SMBJ12A_C353398, Type=TVS
D7: library part 1n4007_c727081, "二极管配置:独立式;正向压降(Vf):1.1V@1A;直流反向耐压(Vr):1kV;整流电流:1A;", Current - Rectified=1A, JLCPCB Part Class="Extended Part", LCSC Part Name="1kV 1A", Manufacturer=TWGMC(迪嘉), ManufacturerPart=1N4007, Non-Repetitive Peak Forward Surge Current=-, Operating Junction Temperature Range=-55℃~+150℃, Reverse Leakage Current (Ir)=5uA, Voltage - DC Reverse(Vr)=1kV, Voltage - Forward(Vf@If)=1.1V@1A, AddInBom=yes, ConvertToPcb=yes, Datasheet=https://item.szlcsc.com/datasheet/1N4007/774186.html, Diode Configuration=独立式, FootprintName=SMA_L4.3-W2.5-LS5.0-RD, ModelId=5b53cc1b87a148cc9fa13125be89f948, ModelName=SMA_L4.3-W2.5-LS5.0-RD, ModelTransform=194.8815,98.425,0,0,0,0,0,0,0, Supplier=LCSC, Supplier Footprint=SMA(DO-214AC), SupplierPart=C727081, Symbol=1N4007_C727081
E1 E2 E3: library part "rvt1c102m1010 1000uf 16v", "容值:1000uF;精度:±20%;额定电压:16V;纹波电流:347mA@120Hz;等效串联电阻(ESR):-;", Equivalent Series Resistance(ESR)=-, JLCPCB Part Class="Extended Part", LCSC Part Name="1000uF ±20% 16V", Manufacturer=DMBJ(振宝佳), ManufacturerPart="RVT1C102M1010 1000UF 16V", Operating Temperature=-55℃~+105℃, Ripple Current=347mA@120Hz, Tolerance=±20%, Voltage Rating=16V, AddInBom=yes, ConvertToPcb=yes, Datasheet=https://item.szlcsc.com/datasheet/RVT1C102M1010%25201000UF%252016V/1060442.html, Diameter=10mm, FootprintName=CAP-SMD_BD10.0-L10.3-W10.3-FD, Height - Seated (Max)=10.2mm, Lifetime=2800hrs@105℃, ModelId=b23815befd5e4172abc55cc8ac2654de, ModelName=CAP-SMD_BD10.0-L10.3-W10.3-FD, ModelTransform=456.692,405.511,0,180,0,0,0,0,0, Supplier=LCSC, Supplier Footprint=SMD,D10xL10.2mm, SupplierPart=C970714, Symbol=RVT1C102M1010_C970714
KEY1 KEY2 KEY3: "电路结构:单刀单掷;按钮形状:矩形按钮;安装方式:直插;开关长度:12mm;开关宽度:12mm;开关高度:7.3mm;触点电流:50mA;额定电压:24V;带灯:-;工作寿命:-;", Contact Current=50mA, JLCPCB Part Class="Extended Part", LCSC Part Name="12*12*7.3mm 直插 轻触开关", Manufacturer=OMRON(欧姆龙), ManufacturerPart=B3F-4055, Voltage Rating=24V, Actuator Style=矩形按钮, AddInBom=yes, Circuit=单刀单掷, ConvertToPcb=yes, Datasheet=https://item.szlcsc.com/datasheet/B3F-4055/86103.html, FootprintName=KEY-TH_4P-L12.0-W12.0-P5.00-LS13.4-EH, Length=12mm, Life=-, ModelId=f5df7606db84426aa31cc381f3ee7a3a, ModelName=KEY-TH_4P-L12.0-W12.0-H7.5-LS12.5-P5.0, ModelTransform=554.73787,472.44,0,0,0,0,0,0.123,-129.921, Mounting Type=直插, Supplier=LCSC, Supplier Footprint=插件-4P,12x12mm, SupplierPart=C84931, Switch Height=7.3mm, Symbol=B3F-4055, Width=12mm, With Lamp=-
L1 L2: "电感值:4.7uH;精度:±20%;额定电流:2.8A;饱和电流(Isat):3A;类型:一体成型电感;", Current - Saturation(Isat)=3A, Current Rating=2.8A, DC Resistance(DCR)=105mΩ, JLCPCB Part Class="Extended Part", LCSC Part Name="4.7uH ±20% 3A", Manufacturer=cjiang(长江微电), ManufacturerPart=FXL0420-4R7-M, Tolerance=±20%, AddInBom=yes, ConvertToPcb=yes, Datasheet=https://item.szlcsc.com/datasheet/FXL0420-4R7-M/178591.html, FootprintName=IND-SMD_L4.4-W4.2, ModelId=e9b3d3f4fa134185b54d517730715f16, ModelName=IND-SMD_L4.2-W4.4-H2.0, ModelTransform=173.228,165.354,0,0,0,0,0,0,0, Supplier=LCSC, Supplier Footprint=SMD,4.4x4.2mm, SupplierPart=C167208, Symbol=FXL0420-4R7-M, Type=一体成型电感
LED1 LED2: "灯头类型:2.0mmx1.2mm方形灯头;发光颜色:蓝色;正向压降(Vf):3.2V;功率:70mW;正向电流:20mA;波长:460nm~475nm;二极管配置:独立二极管;透镜颜色:无色透明透镜;色温:-;发光强度:260mcd;发光角度:120°;载带方式:正贴;工作温度:-40℃~+85℃;", Color Temperature=-, Forward Current=20mA, Illumination Color=蓝色, JLCPCB Part Class="Extended Part", LCSC Part Name=0805蓝贴片式发光二极管, Lens Color=无色透明透镜, Manufacturer=XINGLIGHT(成兴光), ManufacturerPart=XL-2012UBC, Operating Temperature=-40℃~+85℃, Power(Watts)=70mW, Voltage - Forward(Vf)=3.2V, AddInBom=yes, ConvertToPcb=yes, Datasheet=https://item.szlcsc.com/datasheet/XL-2012UBC/1051426.html, Diode Configuration=独立二极管, FootprintName=LED0805-RD, Lamp Holder Type=2.0mmx1.2mm方形灯头, Luminous Intensity=260mcd, ModelId=b1c5ed7a4f6e46d3bc6f6cc7c20f3fea, ModelName=LED0805-RD, ModelTransform=79.527,49.2125,0,0,0,0,0,0,0, Mounting Style=正贴, Peak Wavelength=470nm, Supplier=LCSC, Supplier Footprint=0805, SupplierPart=C965817, Symbol=XL-2012UBC, Viewing Angle=120°, Wavelength - Dominant=460nm~475nm
LED3: "数码管位数:1位;字符尺寸(英寸):0.56;LED极性:共阳极;发光颜色:红色;耗散功率(Pd):50mW;", Forward Voltage Drop=2V, Illumination Color=红色, JLCPCB Part Class="Extended Part", LCSC Part Name="1位0.56英寸红色数码管 共阳极", Manufacturer=ARKLED(方舟), ManufacturerPart=SM410561N, Operating Temperature=-20℃~+80℃, Pd - Power Dissipation=50mW, AddInBom=yes, ConvertToPcb=yes, Datasheet=https://item.szlcsc.com/datasheet/SM410561N/152698.html, Digit/Alpha Size(inch)=0.56, Display Type=7段, FootprintName=LED-SEG-TH_10P-L12.7-W19.0-P2.54-S15.24-BL, Height=8mm, LED Polarity=共阳极, Length=19mm, Light Intensity=25mcd, ModelId=18b7509e039340f0b8556dc4e613bbae, ModelName=LED-SEG-TH_10P-L12.6-W19.0-H8.0-P2.54-S15.24, ModelTransform=496.062,748.03,0,0,0,0,0,0,-137.795, Number of Characters=1位, Supplier=LCSC, Supplier Footprint=插件, SupplierPart=C141368, Symbol=SM410561N, Width=12.6mm
LED4: "数码管位数:-;字符尺寸(英寸):-;LED极性:共阳;发光颜色:深红色;耗散功率(Pd):60mW;", Forward Voltage Drop=2V, Illumination Color=深红色, JLCPCB Part Class="Extended Part", LCSC Part Name=通孔式显示屏, Manufacturer=EVERLIGHT(亿光), ManufacturerPart=B1001SDRWB/S530-A3, Operating Temperature=-40℃~+85℃, Pd - Power Dissipation=60mW, AddInBom=yes, ConvertToPcb=yes, Datasheet=https://www.everlight.com.cn/wp-content/plugins/ItemRelationship/product_files/pdf/B1001SDRWB-S530-A3.pdf, Digit/Alpha Size(inch)=-, Display Type=-, FootprintName=LED-SEG-TH_20P-L25.3-W10.1-P2.54-S7.6-BL, Height=-, LED Polarity=共阳, Length=-, Light Intensity=8.9mcd, ModelId=42196fd8777949cd84d7c826477aa856, ModelName=LED-SEG-TH_20P-L25.3-W10.1-P2.54-S7.6-BL, ModelTransform=996.061,398.0307,0,0,0,0,-0.001,-0.004,-196.85, Number of Characters=-, Supplier=LCSC, Supplier Footprint=DIP-20, SupplierPart=C22863594, Symbol=B1001SDRWB/S530-A3, Width=-
OT1 OT2 OT3 OT4: "输入类型:DC;正向压降(Vf):1.2V;输出电流:50mA;隔离电压(Vrms):3.75kV;直流反向耐压(Vr):6V;负载电压:80V;输出通道数:1;集射极饱和电压(VCE(sat)):200mV@1mA,20mA;", Current Transfer Ratio (CTR) Maximum/Saturation Value=600%, Current Transfer Ratio (CTR) Minimum=50%, Forward Current(If)=50mA, Isolation Voltage(Vrms)=3.75kV, JLCPCB Part Class="Extended Part", LCSC Part Name="DC输入 隔离电压(rms):3750V", Load Voltage=80V, Manufacturer=LITEON(光宝), ManufacturerPart=LTV-356T-C, Operating Temperature=-55℃~+110℃, Reverse Voltage=6V, Voltage - Forward(Vf)=1.2V, AddInBom=yes, ConvertToPcb=yes, Datasheet=https://item.szlcsc.com/datasheet/LTV-356T-C/116700.html, Fall time=3us, FootprintName=SOP-4_L3.9-W4.4-P2.54-LS7.0-TL, Input type=DC, ModelId=ddaef38cfbc4419f8552fc0322b02100, ModelName=SOP-4_L4.0-W4.4-H2.1-LS7.0-P2.54, ModelTransform=157.48,275.824,0,270,0,0,0,0,0, Number of Outputs=1, Output Current=50mA, Output Type=光电三极管, Rise time=4us@2mA,100Ω, Supplier=LCSC, Supplier Footprint=SOP-4-2.54mm, SupplierPart=C115452, Symbol=LTV-356T-C, Vce Saturation(VCE(sat))=200mV@1mA,20mA
Q1: "晶体管类型:PNP;集电极电流(Ic):100mA;集射极击穿电压(Vceo):45V;耗散功率(Pd):200mW;直流电流增益(hFE):200@1.0mA,5.0V;", Collector - Emitter Voltage VCEO=45V, Current - Collector Cutoff=100nA, Current - Collector(Ic)=100mA, DC Current Gain=200@1.0mA,5.0V, Emitter-Base Voltage(Vebo)=5V, JLCPCB Part Class="Extended Part", LCSC Part Name="hFE:200-450，丝印:M6 PNP 电流:0.1A 电压:45V", Manufacturer=R+O(宏嘉诚), ManufacturerPart=S9015, Operating Temperature=-55℃~+150℃, Pd - Power Dissipation=200mW, Transition frequency(fT)=150MHz, AddInBom=yes, ConvertToPcb=yes, Datasheet=https://item.szlcsc.com/datasheet/S9015/21397169.html, FootprintName=SOT-23-3_L2.9-W1.3-P0.95-LS2.4-BR, ModelId=c62791f0466c4ae2a892c056b845b0ca, ModelName=SOT-23-3P_L2.9-W1.3-H1.0-LS2.4-P0.95, ModelTransform=98.425,114.173,0,180,0,0,0.0005,-0.0005,0, Supplier=LCSC, Supplier Footprint=SOT-23, SupplierPart=C20069131, Symbol=S9015_C20069131, Type=PNP, Vce Saturation(VCE(sat))=300mV@100mA,10mA
Q2: "数量:1个N沟道;漏源电压(Vdss):60V;连续漏极电流(Id):380mA;导通电阻(RDS(on)):2.5Ω@4.5V,200mA;耗散功率(Pd):420mW;阈值电压(Vgs(th)):2.3V@250uA;", Current - Continuous Drain(Id)=380mA, Drain to Source Voltage=60V, Gate Threshold Voltage (Vgs(th))=2.3V@250uA, Input Capacitance(Ciss)=45pF, JLCPCB Part Class="Extended Part", LCSC Part Name="1个N沟道 耐压:60V 电流:380mA", Manufacturer=onsemi(安森美), ManufacturerPart=2N7002KT1G, Operating Temperature=-55℃~+150℃, Output Capacitance(Coss)=-, Pd - Power Dissipation=420mW, AddInBom=yes, ConvertToPcb=yes, Datasheet=https://item.szlcsc.com/datasheet/2N7002KT1G/117838.html, FootprintName=SOT-23-3_L2.9-W1.3-P1.90-LS2.4-BR, Gate Charge(Qg)=700pC@4.5V, ModelId=c62791f0466c4ae2a892c056b845b0ca, ModelName=SOT-23-3P_L2.9-W1.3-H1.0-LS2.4-P0.95, ModelTransform=98.425,114.173,0,180,0,0,0.0005,-0.0005,0, Number=1个N沟道, RDS(on)=2.5Ω@4.5V,200mA, Reverse Transfer Capacitance (Crss@Vds)=-, Supplier=LCSC, Supplier Footprint=SOT-23, SupplierPart=C116584, Symbol=2N7002KT1G, Type=N沟道
R1 R2 R3 R4 R5 R6 R7: "电阻类型:厚膜电阻;阻值:10kΩ;精度:±1%;功率:100mW;工作电压:75V;温度系数:±100ppm/℃;", JLCPCB Part Class="Extended Part", LCSC Part Name="10kΩ ±1% 100mW 厚膜电阻", Manufacturer=FOJAN(富捷), ManufacturerPart=FRC0603F1002TS, Operating Temperature=-55℃~+155℃, Power(Watts)=100mW, Temperature Coefficient=±100ppm/℃, Tolerance=±1%, Voltage-Supply(Max)=75V, AddInBom=yes, ConvertToPcb=yes, Datasheet=https://item.szlcsc.com/datasheet/FRC0603F1002TS/3180495.html, FootprintName=R0603, ModelId=fc143cca1e79419f9cd78b61e9279f08, ModelName=R0603, ModelTransform=31.8897,63.7794,0,90,0,0,0,0,0, Supplier=LCSC, Supplier Footprint=0603, SupplierPart=C2906982, Symbol=FRC0603F1002TS, Type=厚膜电阻
R8 R27 R44 R47: "电阻类型:厚膜电阻;阻值:2.2kΩ;精度:±1%;功率:100mW;工作电压:75V;温度系数:±100ppm/℃;", JLCPCB Part Class="Extended Part", LCSC Part Name="2.2kΩ ±1% 100mW 厚膜电阻", Manufacturer=FOJAN(富捷), ManufacturerPart=FRC0603F2201TS, Operating Temperature=-55℃~+155℃, Power(Watts)=100mW, Temperature Coefficient=±100ppm/℃, Tolerance=±1%, Voltage-Supply(Max)=75V, AddInBom=yes, ConvertToPcb=yes, FootprintName=R0603, ModelId=fc143cca1e79419f9cd78b61e9279f08, ModelName=R0603, ModelTransform=31.8897,63.7794,0,90,0,0,0,0,0, Supplier=LCSC, Supplier Footprint=0603, SupplierPart=C2907005, Symbol=FRC0603F2201TS, Type=厚膜电阻
R9 R14: library part frc0603f5100ts, "电阻类型:厚膜电阻;阻值:510Ω;精度:±1%;功率:100mW;工作电压:75V;温度系数:±100ppm/℃;", JLCPCB Part Class="Extended Part", LCSC Part Name="510Ω ±1% 100mW 厚膜电阻", Manufacturer=FOJAN(富捷), ManufacturerPart=FRC0603F5100TS, Operating Temperature=-55℃~+155℃, Power(Watts)=100mW, Temperature Coefficient=±100ppm/℃, Tolerance=±1%, Voltage-Supply(Max)=75V, AddInBom=yes, ConvertToPcb=yes, FootprintName=R0603, ModelId=fc143cca1e79419f9cd78b61e9279f08, ModelName=R0603, ModelTransform=31.8897,63.7794,0,90,0,0,0,0,0, Supplier=LCSC, Supplier Footprint=0603, SupplierPart=C2907048, Symbol=FRC0603F5100TS, Type=厚膜电阻
R10: library part frc0603f5101ts, "电阻类型:厚膜电阻;阻值:5.1kΩ;精度:±1%;功率:100mW;工作电压:75V;温度系数:±100ppm/℃;", JLCPCB Part Class="Extended Part", LCSC Part Name="5.1kΩ ±1% 100mW 厚膜电阻", Manufacturer=FOJAN(富捷), ManufacturerPart=FRC0603F5101TS, Operating Temperature=-55℃~+155℃, Power(Watts)=100mW, Temperature Coefficient=±100ppm/℃, Tolerance=±1%, Voltage-Supply(Max)=75V, AddInBom=yes, ConvertToPcb=yes, FootprintName=R0603, ModelId=fc143cca1e79419f9cd78b61e9279f08, ModelName=R0603, ModelTransform=31.8897,63.7794,0,90,0,0,0,0,0, Supplier=LCSC, Supplier Footprint=0603, SupplierPart=C2907044, Symbol=FRC0603F5101TS, Type=厚膜电阻
R11 R33: library part frc0603f1004ts, "电阻类型:厚膜电阻;阻值:1MΩ;精度:±1%;功率:100mW;工作电压:75V;温度系数:±100ppm/℃;", JLCPCB Part Class="Extended Part", LCSC Part Name="1MΩ ±1% 100mW 厚膜电阻", Manufacturer=FOJAN(富捷), ManufacturerPart=FRC0603F1004TS, Operating Temperature=-55℃~+155℃, Power(Watts)=100mW, Temperature Coefficient=±100ppm/℃, Tolerance=±1%, Voltage-Supply(Max)=75V, AddInBom=yes, ConvertToPcb=yes, Datasheet=https://item.szlcsc.com/datasheet/FRC0603F1004TS/3180516.html, FootprintName=R0603, ModelId=fc143cca1e79419f9cd78b61e9279f08, ModelName=R0603, ModelTransform=31.8897,63.7794,0,90,0,0,0,0,0, Supplier=LCSC, Supplier Footprint=0603, SupplierPart=C2907003, Symbol=FRC0603F1004TS, Type=厚膜电阻
R12 R13 R15 R16 R19 R20 R21: library part 201007f2001t4e, "电阻类型:厚膜电阻;阻值:2kΩ;精度:±1%;功率:750mW;最大工作电压:200V;温度系数:±100ppm/℃;", JLCPCB Part Class="Extended Part", LCSC Part Name="2kΩ ±1% 750mW 厚膜电阻", Manufacturer=UNI-ROYAL(厚声), ManufacturerPart=201007F2001T4E, Operating Temperature Range=-55℃~+155℃, Overload Voltage (Max)=200V, Power(Watts)=750mW, Temperature Coefficient=±100ppm/℃, Tolerance=±1%, AddInBom=yes, ConvertToPcb=yes, Datasheet=https://atta.szlcsc.com/upload/public/pdf/source/20200306/C422600_1E6D84923E4A46A82E41ADD87F860B5C.pdf, FootprintName=R2010, ModelId=dbc57748ea604fd2b52740a9d4619b5e, ModelName=R2010_L5.0-W2.5-H0.6, ModelTransform=196.85,98.425,0,0,0,0,0,-0.0005,0, Supplier=LCSC, Supplier Footprint=2010, SupplierPart=C421898, Symbol=201007F2001T4E, Type=厚膜电阻
R17: library part cq1007f1202t4e, "电阻类型:厚膜电阻;阻值:12kΩ;精度:±1%;功率:750mW;工作电压:200V;温度系数:±100ppm/℃;", JLCPCB Part Class="Extended Part", LCSC Part Name="厚膜电阻 12kΩ ±1% 750mW 汽车级晶片电阻器", Manufacturer=UNI-ROYAL(厚声), ManufacturerPart=CQ1007F1202T4E, Operating Temperature=-55℃~+155℃, Power(Watts)=750mW, Temperature Coefficient=±100ppm/℃, Tolerance=±1%, Voltage-Supply(Max)=200V, AddInBom=yes, ConvertToPcb=yes, Datasheet=https://item.szlcsc.com/datasheet/CQ1007F1202T4E/1052162.html, FootprintName=R2010, ModelId=dbc57748ea604fd2b52740a9d4619b5e, ModelName=R2010_L5.0-W2.5-H0.6, ModelTransform=196.85,98.425,0,0,0,0,0,-0.0005,0, Supplier=LCSC, Supplier Footprint=2010, SupplierPart=C966294, Symbol=CQ1007F1202T4E, Type=厚膜电阻
R18 R23 R24 R25 R26 R28 R29 R31 R32 R34 R35 R37 R38 R40 R45 R46 R48 R49 R51: library part frc0603f1001ts, "电阻类型:厚膜电阻;阻值:1kΩ;精度:±1%;功率:100mW;工作电压:75V;温度系数:±100ppm/℃;", JLCPCB Part Class="Extended Part", LCSC Part Name="1kΩ ±1% 100mW 厚膜电阻", Manufacturer=FOJAN(富捷), ManufacturerPart=FRC0603F1001TS, Operating Temperature=-55℃~+155℃, Power(Watts)=100mW, Temperature Coefficient=±100ppm/℃, Tolerance=±1%, Voltage-Supply(Max)=75V, AddInBom=yes, ConvertToPcb=yes, FootprintName=R0603, ModelId=fc143cca1e79419f9cd78b61e9279f08, ModelName=R0603, ModelTransform=31.8897,63.7794,0,90,0,0,0,0,0, Supplier=LCSC, Supplier Footprint=0603, SupplierPart=C2907002, Symbol=FRC0603F1001TS, Type=厚膜电阻
R22 R36: library part frc1206f4701ts, "电阻类型:厚膜电阻;阻值:4.7kΩ;精度:±1%;功率:250mW;工作电压:200V;温度系数:±100ppm/℃;", JLCPCB Part Class="Extended Part", LCSC Part Name="4.7kΩ ±1% 250mW 厚膜电阻", Manufacturer=FOJAN(富捷), ManufacturerPart=FRC1206F4701TS, Operating Temperature=-55℃~+155℃, Power(Watts)=250mW, Temperature Coefficient=±100ppm/℃, Tolerance=±1%, Voltage-Supply(Max)=200V, AddInBom=yes, ConvertToPcb=yes, FootprintName=R1206, ModelId=89a1f13db2384da588040e0b3c55bf66, ModelName=R1206_L3.2-W1.6-H0.6, ModelTransform=125.984,62.992,0,0,0,0,0,0,0, Supplier=LCSC, Supplier Footprint=1206, SupplierPart=C2907387, Symbol=FRC1206F4701TS, Type=厚膜电阻
R30: library part frc0603f1501ts, "电阻类型:厚膜电阻;阻值:1.5kΩ;精度:±1%;功率:100mW;工作电压:75V;温度系数:±100ppm/℃;", JLCPCB Part Class="Extended Part", LCSC Part Name="1.5kΩ ±1% 100mW 厚膜电阻", Manufacturer=FOJAN(富捷), ManufacturerPart=FRC0603F1501TS, Operating Temperature=-55℃~+155℃, Power(Watts)=100mW, Temperature Coefficient=±100ppm/℃, Tolerance=±1%, Voltage-Supply(Max)=75V, AddInBom=yes, ConvertToPcb=yes, FootprintName=R0603, ModelId=fc143cca1e79419f9cd78b61e9279f08, ModelName=R0603, ModelTransform=31.8897,63.7794,0,90,0,0,0,0,0, Supplier=LCSC, Supplier Footprint=0603, SupplierPart=C2930050, Symbol=FRC0603F1501TS, Type=厚膜电阻
R39: library part rs-03k3300ft, "电阻类型:厚膜电阻;阻值:330Ω;精度:±1%;功率:100mW;工作电压:50V;温度系数:±100ppm/℃;", JLCPCB Part Class="Extended Part", LCSC Part Name="厚膜电阻 330Ω ±1% 100mW", Manufacturer=FH(风华), ManufacturerPart=RS-03K3300FT, Operating Temperature=-55℃~+155℃, Power(Watts)=100mW, Temperature Coefficient=±100ppm/℃, Tolerance=±1%, Voltage-Supply(Max)=50V, AddInBom=yes, ConvertToPcb=yes, Datasheet=https://item.szlcsc.com/datasheet/RS-03K3300FT/137047.html, FootprintName=R0603, ModelId=fc143cca1e79419f9cd78b61e9279f08, ModelName=R0603, ModelTransform=31.8897,63.7794,0,90,0,0,0,0,0, Supplier=LCSC, Supplier Footprint=0603, SupplierPart=C125768, Symbol=RS-03K331FT, Type=厚膜电阻
R41: "电阻类型:厚膜电阻;阻值:100kΩ;精度:±5%;功率:250mW;工作电压:200V;温度系数:±100ppm/℃;", JLCPCB Part Class="Extended Part", LCSC Part Name="100kΩ ±5% 250mW 厚膜电阻", Manufacturer=FOJAN(富捷), ManufacturerPart="FRC1206J104 TS", Operating Temperature=-55℃~+155℃, Power(Watts)=250mW, Temperature Coefficient=±100ppm/℃, Tolerance=±5%, Voltage-Supply(Max)=200V, AddInBom=yes, ConvertToPcb=yes, FootprintName=R1206, ModelId=89a1f13db2384da588040e0b3c55bf66, ModelName=R1206_L3.2-W1.6-H0.6, ModelTransform=125.984,62.992,0,0,0,0,0,0,0, Supplier=LCSC, Supplier Footprint=1206, SupplierPart=C2907421, Symbol="FRC1206J104 TS", Type=厚膜电阻
R42: "电阻类型:厚膜电阻;阻值:2.2kΩ;精度:±5%;功率:250mW;工作电压:200V;温度系数:±100ppm/℃;", JLCPCB Part Class="Extended Part", LCSC Part Name="2.2kΩ ±5% 250mW 厚膜电阻", Manufacturer=FOJAN(富捷), ManufacturerPart="FRC1206J222 TS", Operating Temperature=-55℃~+155℃, Power(Watts)=250mW, Temperature Coefficient=±100ppm/℃, Tolerance=±5%, Voltage-Supply(Max)=200V, AddInBom=yes, ConvertToPcb=yes, FootprintName=R1206, ModelId=89a1f13db2384da588040e0b3c55bf66, ModelName=R1206_L3.2-W1.6-H0.6, ModelTransform=125.984,62.992,0,0,0,0,0,0,0, Supplier=LCSC, Supplier Footprint=1206, SupplierPart=C2907443, Symbol="FRC1206J222 TS", Type=厚膜电阻
R43: library part frc0603f4702ts, "电阻类型:厚膜电阻;阻值:47kΩ;精度:±1%;功率:100mW;工作电压:75V;温度系数:±100ppm/℃;", JLCPCB Part Class="Extended Part", LCSC Part Name="47kΩ ±1% 100mW 厚膜电阻", Manufacturer=FOJAN(富捷), ManufacturerPart=FRC0603F4702TS, Operating Temperature=-55℃~+155℃, Power(Watts)=100mW, Temperature Coefficient=±100ppm/℃, Tolerance=±1%, Voltage-Supply(Max)=75V, AddInBom=yes, ConvertToPcb=yes, FootprintName=R0603, ModelId=fc143cca1e79419f9cd78b61e9279f08, ModelName=R0603, ModelTransform=31.8897,63.7794,0,90,0,0,0,0,0, Supplier=LCSC, Supplier Footprint=0603, SupplierPart=C2907042, Symbol=FRC0603F4702TS, Type=厚膜电阻
R50: "电阻类型:厚膜电阻;阻值:4.6kΩ;精度:±1%;功率:125mW;工作电压:150V;温度系数:±100ppm/℃;", JLCPCB Part Class="Extended Part", LCSC Part Name="4.6kΩ ±1% 125mW 厚膜电阻", Manufacturer=FOJAN(富捷), ManufacturerPart=FRC0805F4601TS, Operating Temperature=-55℃~+155℃, Power(Watts)=125mW, Temperature Coefficient=±100ppm/℃, Tolerance=±1%, Voltage-Supply(Max)=150V, AddInBom=yes, ConvertToPcb=yes, Datasheet=https://item.szlcsc.com/datasheet/FRC0805F4601TS/3279549.html, FootprintName=R0805, ModelId=37a81e68749a4138bd2dfa6897b24b85, ModelName=R0805_L2.0-W1.3-H0.6, ModelTransform=78.74,51.181,0,0,0,0,0,-0.0005,0, Supplier=LCSC, Supplier Footprint=0805, SupplierPart=C2933447, Symbol=FRC0805F4601TS, Type=厚膜电阻
U1 U3: library part cj78m05_c9070, "输出类型:固定;工作电压:35V;输出电压:5V;输出电流:500mA;电源纹波抑制比(PSRR):80dB@(120Hz);输出极性:正极;", JLCPCB Part Class="Extended Part", LCSC Part Name="输入35V 输出5V 500mA", Manufacturer=CJ(江苏长电/长晶), ManufacturerPart=CJ78M05, Operating Temperature=-40℃~+125℃@(Tj), Output Current=500mA, Output Voltage=5V, Power Supply Rejection Ratio (PSRR)=80dB@(120Hz), standby current=4.2mA, Voltage - Supply=35V, Voltage Dropout=2V@(350mA), AddInBom=yes, ConvertToPcb=yes, Datasheet=https://item.szlcsc.com/datasheet/CJ78M05/9591.html, FootprintName=TO-252-3_L6.5-W5.8-P4.58-TL, ModelId=9aa45f6a769e40598a70aafe95110c28, ModelName=TO-252-3L-3P_L6.6-W6.1-H2.3-LS9.5-P4.6, ModelTransform=259.842,372.80792,0,270,0,0,38.026,1.683,0, Noise=-, Number of Outputs=1, Output Configuration=正极, Output Type=固定, Supplier=LCSC, Supplier Footprint=TO-252-2L, SupplierPart=C9070, Symbol=CJ78M05_C9070
U2: library part m0518ld2ae_1, "CPU内核:ARM Cortex-M0;CPU最大主频:50MHz;CPU位数:32 Bit;", JLCPCB Part Class="Extended Part", LCSC Part Name="NuMicro M0518系列", Manufacturer=NUVOTON(新唐), ManufacturerPart=M0518LD2AE, Operating Temperature=-40℃~+105℃, Voltage - Supply=2.5V~5.5V, ADC (Bit)=12bit, AddInBom=yes, ConvertToPcb=yes, Core Size="32 Bit", CPU Core="ARM Cortex-M0", CPU Maximum Speed=50MHz, Datasheet=https://item.szlcsc.com/datasheet/M0518LD2AE/261248.html, EEPROM=-, FootprintName=LQFP-48_L7.0-W7.0-P0.50-LS9.0-BL, ModelId=093be70396ff421eb2cdb946d5311efc, ModelName=LQFP-48_L7.0-W7.0-H1.4-LS9.0-P0.50, ModelTransform=354.331,354.331,0,0,0,0,0,0,0, Number of I/O=42, Oscillator Type=内置, Program Memory Type=FLASH, Program Storage Size=68KB, RAM Size=8KB, Supplier=LCSC, Supplier Footprint=LQFP-48(7x7), SupplierPart=C272862, Symbol=M0518LD2AE
U4: "B1212S-2WR3是专门针对板上电源系统中需要产生一组与输入电源隔离的电压的应用场合而设计的。该产品适用于：1）输入电源的电压比较稳定（电压变化范围±10%Vin）；2）输入输出之间要求隔离（隔离电压≤1500VDC）；3）对输出电压稳定度要求不高；4）典型应用：纯数字电路场合，一般低频模拟电路场合，继电器驱动电路，数据交换电路场合等特点：定电压输入，隔离非稳压输出，2W，隔离电压：1500VDC，效率：高达 84%。", Capacitive Load(Max)=560uF, Isolation Voltage(Vrms)=1.5kV, JLCPCB Part Class="Extended Part", LCSC Part Name=2W定电压输入隔离非稳压单路输出DC/DC电源模块, Manufacturer=YLPTEC(易川), ManufacturerPart=B1212S-2WR3, Operating Temperature=-40℃~+85℃, Output Current(Max)=166mA, Output Power=2W, Output Voltage=12V, Voltage - Supply=10.8V~13.2V, AddInBom=yes, Conversion Efficiency=86%, ConvertToPcb=yes, Datasheet=https://item.szlcsc.com/datasheet/B1212S-2WR3/3456892.html, Features=短路保护；低功耗, FootprintName=PWRM-TH_4P-L19.7-W7.1-P2.54_DEXU_NN2-12S05CN, Function=-, Height=10mm, Length=19.5mm, ModelId=1296e1ddb23741649fe3427605259121, ModelName=PWRM-TH_4P-L19.7-W7.1-P2.54_DEXU_NN2-12S05CN, ModelTransform=771.652,277.9522,0,0,0,0,50.197,-102.362,-157.48, Number of Channels=1, Supplier=LCSC, Supplier Footprint=SIP,19.5x7mm, SupplierPart=C2992389, Symbol=B1212S-2WR3_C2992389, Width=7mm